# Altium PCB AVault.PcbDoc (part 2 of 2)
Units mm, origin at the board's own origin, x right, y up, seen from the top; angles counter-clockwise.
Board outline 85.78 x 73.28 mm, 2 copper layers (Top Layer, Bottom Layer); 122 components, 80 nets, 439 pads, 261 vias.
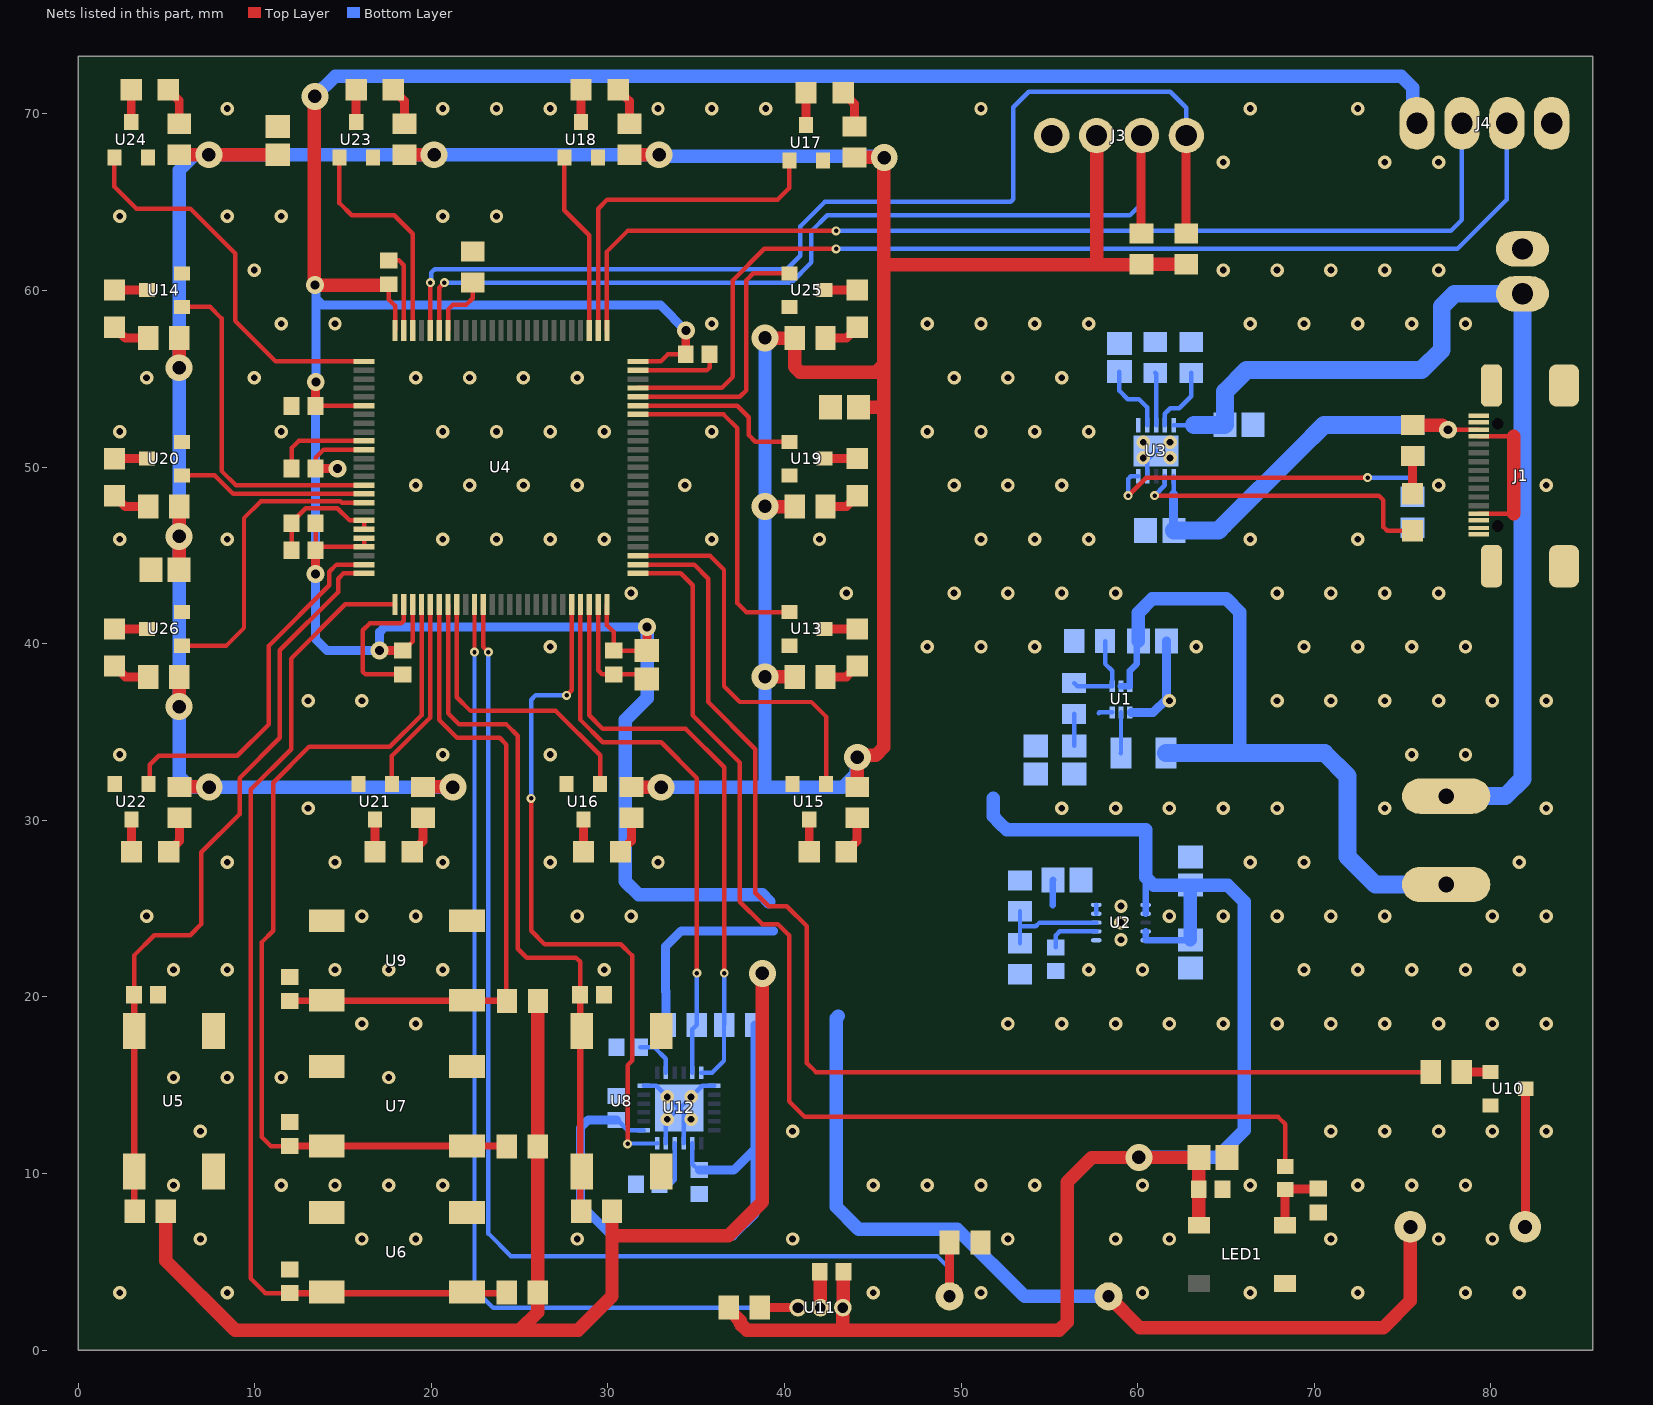
[diagram p2: the nets of this part, all layers, seen from the top]

## Via types
v1: diameter 0.762, hole 0.381, Top Layer to Bottom Layer, tented both sides, 222 vias
v2: diameter 1.524, hole 0.762, Top Layer to Bottom Layer, tented both sides, 17 vias
v3: diameter 0.508, hole 0.254, Top Layer to Bottom Layer, tented both sides, 14 vias
v4: diameter 1.016, hole 0.508, Top Layer to Bottom Layer, tented both sides, 8 vias

## Nets (pads, with @x,y where several pads share a name; then routed paths per layer and width w, separated by ;. In a path a pad name is that pad's centre, name@x,y a point inside that pad or via, vN(x,y) a via of type N, cw(c..) or ccw(c..) an arc to the next point about the centre after c; other vN are vias at no path point)
+3V3: B1.1 C6.2 C11.2 C12.2 C13.2 C14.2 C15.2 C16.2 C17.2 C18.2 C19.2 C29.2 C31.2 J4.1 R4.2 R10.2 R11.2 R12.2 R13.2 R16.2 R20.2 R21.2 R22.1 U2.9 U2.10 U4.6 U4.11 U4.21 U4.22 U4.28 U4.50 U4.75 U4.100 U12.8 U12.13 | length 374.8
  Top Layer w0.254: C12.2@13.448,46.824 C11.2@13.448,45.3 13.633,45.485 U4.22@16.2,45.485 U4.21@16.2,45.985 ; C13.2@13.448,49.919 13.462,49.933 13.462,50.546 13.901,50.985 U4.11@16.2,50.985 ; C19.2@13.448,53.464 13.469,53.485 U4.6@16.2,53.485 ; C17.2@17.599,60.359 17.599,59.49 17.949,59.14 U4.100@17.949,57.734 ; C14.2@18.377,39.61 18.427,39.61 18.949,40.133 U4.28@18.949,42.235 ; U4.50@29.95,42.235 29.95,41.049 30.325,40.674 C15.2@30.325,39.61 30.327,39.608 C18.2@32.204,39.608 ; U4.75@31.699,55.985 32.998,55.985 33.401,56.388 34.408,56.388 C16.2@34.411,56.385
  Top Layer w0.508: v4@13.448,43.968 C11.2@13.448,45.3 ; C19.2@13.448,53.464 v4@13.448,54.796 ; C13.2@13.457,49.911 13.461,49.915 14.684,49.915 v4(14.689,49.911) ; v4@17.095,39.61 C14.2@18.427,39.61 ; C18.2@32.204,39.608 v4@32.204,40.941 ; C16.2@34.411,56.385 v4@34.411,57.717
  Top Layer w0.762: R10.2@4.963,7.865 4.963,5.07 8.89,1.143 25.019,1.143 ; v2@13.38,70.959 13.38,60.359 v4(13.413,60.325) ; v4@13.432,60.307 C17.2@17.548,60.307 ; R16.2@26.045,19.78 26.035,19.77 26.035,2.159 25.019,1.143 ; R13.2@30.236,7.865 30.236,6.477 ; v2(38.754,21.336) 38.754,8.401 36.83,6.477 30.236,6.477 ; R22.1@58.348,3.048 60.126,1.27 73.914,1.27 75.438,2.794 B1.1@75.438,6.985 ; 25.019,1.143 28.321,1.143 30.236,3.058 30.236,6.477
  Bottom Layer w0.254: C29.2@30.53,13.041 31.105,12.466 U12.13@32.045,12.466 ; U12.8@34.786,11.725 34.786,10.543 35.129,10.2 C31.2@35.179,10.2 ; U2.9@57.651,24.714 U2.10@57.651,25.214
  Bottom Layer w0.381: 55.19,25.197 55.19,26.614 C6.2@55.203,26.627
  Bottom Layer w0.508: v4(13.413,60.325) 13.462,60.276 13.462,59.563 ; v4@13.435,54.783 13.435,49.911 ; v4(13.462,54.81) 13.462,59.563 ; v4(14.689,49.911) 13.435,49.911 ; C29.2@30.48,13.041 28.894,13.041 28.448,12.595 28.448,8.255 30.226,6.477 37.084,6.477 38.34,7.733 38.34,11.416 ; v4(32.218,40.954) 17.379,40.954 17.082,40.657 v4(17.082,39.624) 14.097,39.624 13.435,40.286 v4(13.435,43.954) 13.435,49.911 ; R20.2@33.288,18.415 33.281,18.422 33.281,20.313 33.274,20.32 33.274,22.86 34.163,23.749 39.37,23.749 ; v4(34.424,57.731) 32.973,59.182 13.843,59.182 13.462,59.563 ; C31.2@35.179,10.2 37.124,10.2 38.34,11.416 ; R21.2@38.34,18.415 38.34,11.416
  Bottom Layer w0.762: v2(13.413,70.993) 14.556,72.136 74.93,72.136 75.582,71.484 75.582,69.706 J4.1@75.819,69.469 ; v4(32.218,40.954) 32.218,36.917 30.988,35.687 30.988,26.543 31.75,25.781 38.735,25.781 39.116,25.4 ; 43.053,18.923 42.926,18.796 42.926,8.128 44.196,6.858 49.784,6.858 53.594,3.048 R22.1@58.348,3.048
+5V: C2.2 C3.2 C4.2 C5.2 C25.2 C26.2 C28.2 C33.2 C34.2 C35.2 J3.2 LED1.1 R1.1 R14.2 R15.2 R19.2 R24.2 R25.2 R26.2 R27.2 R28.2 R29.2 R30.2 R31.2 R32.2 R33.2 R34.2 R35.2 R36.2 R37.2 U1.6 U2.1 U2.2 U2.4 U2.5 U11.1 | length 317.4
  Top Layer w0.762: C34.2@5.724,44.196 v2(5.724,46.081) ; v2@5.733,36.449 R34.2@5.733,38.122 ; v2@5.733,46.09 R30.2@5.733,47.762 ; v2@5.733,55.635 R24.2@5.733,57.307 ; R32.2@5.733,67.697 v2@7.405,67.697 ; R36.2@5.75,31.895 v2@7.422,31.895 ; v2(7.414,67.688) C33.2@11.303,67.688 ; R33.2@18.478,67.697 v2@20.15,67.697 ; R37.2@19.54,31.895 v2@21.212,31.895 ; R26.2@31.222,67.697 v2@32.895,67.697 ; R28.2@31.33,31.895 31.339,31.886 33.011,31.886 v2(33.02,31.877) ; R19.2@36.844,2.413 36.844,2.313 R19.2@37.038,2.119 ; R19.2@37.039,2.119 37.486,1.673 37.486,1.517 37.86,1.143 43.307,1.143 ; v2@38.906,38.122 R25.2@40.578,38.122 ; v2@38.906,47.768 R31.2@40.578,47.768 ; v2@38.906,57.307 R35.2@40.578,57.307 40.578,55.67 40.875,55.372 45.18,55.372 45.627,55.818 ; C28.2@43.347,4.445 43.327,4.425 43.327,2.433 U11.1@43.307,2.413 43.307,1.143 ; R27.2@43.967,67.534 v2@45.64,67.534 ; R29.2@44.12,31.895 v2@44.12,33.567 ; v2(44.129,33.576) 44.247,33.695 45.18,33.695 45.627,34.141 45.627,53.086 45.627,55.818 ; C35.2@44.204,53.386 45.627,53.386 ; v2(45.649,67.525) 45.627,67.504 45.627,61.468 ; J3.2@57.673,68.772 57.673,61.468 ; R15.2@60.213,61.468 57.673,61.468 ; R15.2@60.213,61.482 R14.2@62.753,61.482 ; LED1.1@63.477,7.079 63.469,7.088 63.469,10.904 C26.2@63.46,10.913 57.395,10.913 56.007,9.525 56.007,1.589 55.561,1.143 43.307,1.143 ; 45.627,55.818 45.627,61.468 ; 45.627,61.468 57.673,61.468
  Bottom Layer w0.254: C3.2@56.402,34.223 R1.1@56.402,36.028 ; 57.785,36.068 57.829,36.112 U1.6@58.555,36.112
  Bottom Layer w0.381: U2.4@60.451,23.714 U2.5@60.451,23.214 62.966,23.214 C5.2@62.988,23.236 ; U2.2@60.451,24.714 U2.1@60.451,25.214 60.451,26.78 60.452,26.781
  Bottom Layer w0.762: v2(21.221,31.886) v2(7.431,31.886) 6.341,31.886 5.724,32.503 v2(5.724,36.44) v2(5.724,46.081) v2(5.724,55.626) 5.724,66.811 6.601,67.688 v2(7.414,67.688) v2(20.159,67.688) v2@32.624,67.688 ; v2(32.904,67.688) 32.985,67.607 45.567,67.607 v2(45.649,67.525) ; v2(33.02,31.877) 38.862,31.877 ; v2(38.897,57.316) v2(38.897,47.777) v2(38.897,38.131) 38.897,31.912 38.862,31.877 ; v2(44.129,33.576) 44.069,33.516 44.069,32.639 43.307,31.877 38.862,31.877 ; 51.816,31.242 51.816,30.226 52.197,29.845 52.578,29.464 60.452,29.464 60.452,26.781 60.898,26.335 C4.2@62.988,26.335 ; v2(60.071,10.922) 64.516,10.922 66.04,12.446 66.04,25.4 65.105,26.335 C4.2@62.988,26.335 ; C5.2@62.988,23.236 C4.2@62.988,26.335
GND: C1.1 C2.1 C3.1 C4.1 C5.1 C6.1 C7.1 C8.1 C9.2 C10.1 C11.1 C12.1 C13.1 C14.1 C15.1 C16.1 C17.1 C18.1 C19.1 C20.1 C21.1 C22.1 C23.1 C24.1 C25.1 C26.1 C27.1 C28.1 C29.1 C30.1 C31.1 C32.1 C33.1 C34.1 C35.1 J1.A1 J1.A12 J1.B1 J1.B12 J1.S_1 J1.S_2 J1.S_3 J1.S_4 J2.2 J3.1 J4.4 LED1.3 R2.1 R5.1 R6.1 R7.1 R9.1 R23.1 R38.1 U1.4 U2.6 U2.11 U3.4 U3.6 U3.11 U4.10 U4.19 U4.20 U4.27 U4.49 U4.74 U4.99 U5.3 U5.4 U6.3 U6.4 U7.3 U7.4 U8.3 U8.4 U9.3 U9.4 U10.2 U11.2 U12.1 U12.9 U12.11 U12.18 U12.25 U13.2 U14.2 U15.2 U16.2 U17.2 U18.2 U19.2 U20.2 U21.2 U22.2 U23.2 U24.2 U25.2 U26.2 | length 55.2
  Top Layer w0.254: C11.1@12.099,45.3 12.099,46.874 12.896,47.672 14.685,47.672 15.372,46.985 U4.19@16.2,46.985 U4.20@16.2,46.484 ; C13.1@12.099,49.919 12.099,51.088 12.495,51.484 U4.10@16.2,51.484 ; C17.1@17.599,61.708 18.175,61.708 18.45,61.433 U4.99@18.45,57.734 ; C14.1@18.377,38.261 16.278,38.261 16.129,38.409 16.129,40.767 16.51,41.148 18.301,41.148 18.45,41.297 U4.27@18.45,42.235 ; U4.49@29.449,42.235 29.449,38.496 29.684,38.261 C15.1@30.325,38.261 31.952,38.261 C18.1@32.204,38.008 ; U4.74@31.699,55.484 35.612,55.484 35.76,55.633 C16.1@35.76,56.385
  Top Layer w0.762: C28.1@41.997,4.445 42.017,4.425 42.017,2.433 U11.2@42.037,2.413
  Bottom Layer w0.254: U12.18@32.045,14.966 32.735,14.966 33.985,13.716 U12.25@34.036,13.716 ; U12.11@33.286,11.725 33.286,12.966 U12.25@34.036,13.716 ; U12.25@34.087,13.716 35.337,14.966 U12.1@36.027,14.966 ; U12.9@34.286,11.725 34.286,13.466 U12.25@34.036,13.716 ; U3.4@60.54,49.479 60.54,50.427 U3.11@61.04,50.927
  Bottom Layer w0.508: U1.4@59.659,36.112 60.877,36.112 61.633,36.868 C1.1@61.633,40.154
  other v1: 2.359,3.248 8.455,3.248 45.031,3.248 51.127,3.248 60.271,3.248 66.367,3.248 72.463,3.248 78.559,3.248 81.607,3.248 6.931,6.296 16.075,6.296 19.123,6.296 28.267,6.296 40.459,6.296 52.651,6.296 58.747,6.296 61.795,6.296 70.939,6.296 77.035,6.296 80.083,6.296 5.407,9.344 11.503,9.344 14.551,9.344 17.599,9.344 20.647,9.344 45.031,9.344 48.079,9.344 51.127,9.344 54.175,9.344 60.271,9.344 66.367,9.344 72.463,9.344 75.511,9.344 78.559,9.344 6.931,12.392 40.459,12.392 70.939,12.392 73.987,12.392 77.035,12.392 80.083,12.392 83.131,12.392 33.36,13.081 34.712,13.081 33.36,14.341 34.712,14.341 5.407,15.44 8.455,15.44 11.503,15.44 17.599,15.44 16.075,18.488 19.123,18.488 52.651,18.488 55.699,18.488 58.747,18.488 61.795,18.488 64.843,18.488 67.891,18.488 70.939,18.488 73.987,18.488 77.035,18.488 80.083,18.488 83.131,18.488 5.407,21.536 8.455,21.536 14.551,21.536 17.599,21.536 20.647,21.536 29.791,21.536 57.223,21.536 60.271,21.536 69.415,21.536 72.463,21.536 75.511,21.536 78.559,21.536 81.607,21.536 59.055,23.241 59.051,24.216 3.883,24.584 16.075,24.584 19.123,24.584 28.267,24.584 31.315,24.584 61.795,24.584 64.843,24.584 67.891,24.584 70.939,24.584 73.987,24.584 80.083,24.584 83.131,24.584 59.055,25.146 8.455,27.632 14.551,27.632 20.647,27.632 26.743,27.632 32.839,27.632 66.367,27.632 69.415,27.632 81.607,27.632 13.027,30.68 55.699,30.68 58.747,30.68 61.795,30.68 64.843,30.68 67.891,30.68 73.987,30.68 83.131,30.68 2.359,33.728 20.647,33.728 26.743,33.728 75.511,33.728 78.559,33.728 13.027,36.776 16.075,36.776 61.795,36.776 67.891,36.776 70.939,36.776 73.987,36.776 77.035,36.776 80.083,36.776 83.131,36.776 26.743,39.824 48.079,39.824 51.127,39.824 54.175,39.824 63.319,39.824 69.415,39.824 72.463,39.824 75.511,39.824 78.559,39.824 31.315,42.872 43.507,42.872 49.603,42.872 52.651,42.872 55.699,42.872 58.747,42.872 67.891,42.872 70.939,42.872 73.987,42.872 77.035,42.872 2.359,45.92 8.455,45.92 20.647,45.92 23.695,45.92 26.743,45.92 29.791,45.92 35.887,45.92 41.983,45.92 51.127,45.92 54.175,45.92 57.223,45.92 66.367,45.92 72.463,45.92 19.123,48.968 22.171,48.968 25.219,48.968 28.267,48.968 34.363,48.968 49.603,48.968 52.651,48.968 55.699,48.968 77.035,48.968 83.131,48.968 60.307,50.52 61.831,50.52 60.307,51.409 61.831,51.409 2.359,52.016 11.503,52.016 20.647,52.016 23.695,52.016 26.743,52.016 29.791,52.016 35.887,52.016 48.079,52.016 51.127,52.016 54.175,52.016 57.223,52.016 3.883,55.064 9.979,55.064 19.123,55.064 22.171,55.064 25.219,55.064 28.267,55.064 49.603,55.064 52.651,55.064 55.699,55.064 11.503,58.112 14.551,58.112 35.887,58.112 48.079,58.112 51.127,58.112 54.175,58.112 57.223,58.112 66.367,58.112 69.415,58.112 72.463,58.112 75.511,58.112 78.559,58.112 9.979,61.16 64.843,61.16 67.891,61.16 70.939,61.16 73.987,61.16 77.035,61.16 2.359,64.208 8.455,64.208 11.503,64.208 20.647,64.208 23.695,64.208 64.843,67.256 73.987,67.256 77.035,67.256 8.455,70.304 20.647,70.304 23.695,70.304 26.743,70.304 32.839,70.304 35.887,70.304 38.935,70.304 51.127,70.304 66.367,70.304 72.463,70.304
NetB1_2: B1.2 U10.3 | length 7.8
  Top Layer w0.508: B1.2@81.938,6.985 81.955,7.002 81.955,14.788 U10.3@81.973,14.805
NetC7_2: C7.2 U2.7 | length 3.1
  Bottom Layer w0.254: C7.2@55.368,22.811 55.372,22.815 55.372,23.495 55.591,23.714 U2.7@57.651,23.714
NetC10_2: C10.2 U3.7 | length 4.1
  Bottom Layer w0.254: C10.2@58.966,55.407 58.966,54.318 59.436,53.848 60.071,53.848 60.54,53.379 U3.7@60.54,52.375
NetC20_2: C20.2 R10.1 U4.25 U5.1 U5.2 | length 43.4
  Top Layer w0.254: C20.2@3.181,20.134 3.175,20.14 3.175,22.352 4.318,23.495 6.35,23.495 6.985,24.13 6.985,28.194 9.144,30.353 9.144,32.385 11.43,34.671 11.43,39.624 14.732,42.926 14.732,43.688 15.028,43.984 U4.25@16.2,43.984
  Top Layer w0.381: C20.2@3.181,20.134 3.181,7.897 R10.1@3.213,7.865
NetC21_2: C21.2 R11.1 U4.26 U6.1 U6.2 | length 58.1
  Top Layer w0.254: C21.2@11.989,3.23 10.613,3.23 9.779,4.064 9.779,31.75 12.065,34.036 12.065,39.165 15.135,42.235 U4.26@17.949,42.235
  Top Layer w0.381: C21.2@11.989,3.23 14.083,3.23 22.033,3.23 24.232,3.23 R11.1@24.272,3.27
NetC22_2: C22.2 R12.1 U4.29 U7.1 U7.2 | length 50.7
  Top Layer w0.254: C22.2@11.989,11.561 10.918,11.561 10.414,12.065 10.414,23.114 11.049,23.749 11.049,32.131 13.081,34.163 17.653,34.163 19.449,35.959 U4.29@19.449,42.235
  Top Layer w0.381: C22.2@11.989,11.561 U7.2@14.083,11.561 U7.1@22.033,11.561 24.236,11.561 R12.1@24.272,11.525
NetC23_2: C23.2 R13.1 U4.32 U8.1 U8.2 | length 40.7
  Top Layer w0.254: U4.32@20.95,42.235 20.95,36.073 21.59,35.433 24.257,35.433 24.892,34.798 24.892,22.733 25.4,22.225 28.194,22.225 28.432,21.987 C23.2@28.432,20.134
  Top Layer w0.381: C23.2@28.432,20.134 28.432,18.08 28.432,10.13 28.432,7.919 R13.1@28.486,7.865
NetC24_2: C24.2 R16.1 U4.31 U9.1 U9.2 | length 37.8
  Top Layer w0.254: U4.31@20.449,42.235 20.449,35.685 21.463,34.671 23.876,34.671 24.257,34.29 24.257,19.818 R16.1@24.295,19.78
  Top Layer w0.381: C24.2@11.989,19.78 R16.1@24.295,19.78
NetC27_2: C27.2 LED1.4 R18.2 | length 3.9
  Top Layer w0.508: LED1.4@68.349,7.079 R18.2@68.349,9.112 68.369,9.132 70.211,9.132 C27.2@70.231,9.152
NetC30_2: C30.2 U12.20 | length 2.5
  Bottom Layer w0.254: C30.2@31.83,17.145 32.639,17.145 33.286,16.498 U12.20@33.286,15.707
NetC32_2: C32.2 U12.10 | length 3
  Bottom Layer w0.254: C32.2@32.933,9.398 33.528,9.398 33.786,9.656 U12.10@33.786,11.725
NetD1_1: D1.1 R3.1 | length 2.1
  Top Layer w0.508: D1.1@75.565,48.494 75.571,48.5 75.571,50.627 R3.1@75.577,50.633
NetD1_2: D1.2 U3.2 | length 17.7
  Top Layer w0.254: v3(60.96,48.387) 73.66,48.387 73.914,48.133 73.914,46.609 74.129,46.394 D1.2@75.565,46.394
  Bottom Layer w0.254: v3(60.96,48.387) 61.54,48.967 U3.2@61.54,49.479
NetD2_1: D2.1 R24.1 | length 2.2
  Top Layer w0.508: D2.1@2.064,57.924 2.681,57.307 R24.1@3.983,57.307
NetD2_2: D2.2 U14.3 | length 1.8
  Top Layer w0.508: D2.2@2.064,60.024 U14.3@3.896,60.024
NetD3_1: D3.1 R25.1 | length 2
  Top Layer w0.508: R25.1@42.328,38.122 43.503,38.122 D3.1@44.12,38.739
NetD3_2: D3.2 U13.3 | length 1.8
  Top Layer w0.508: U13.3@42.275,40.839 D3.2@44.12,40.839
NetD4_1: D4.1 R26.1 | length 2.2
  Top Layer w0.508: D4.1@30.588,71.366 31.222,70.732 R26.1@31.222,69.447
NetD4_2: D4.2 U18.3 | length 1.8
  Top Layer w0.508: U18.3@28.488,69.534 D4.2@28.488,71.366
NetD5_1: D5.1 R27.1 | length 2.2
  Top Layer w0.508: D5.1@43.325,71.203 43.967,70.561 R27.1@43.967,69.284
NetD5_2: D5.2 U17.3 | length 1.8
  Top Layer w0.508: U17.3@41.225,69.372 D5.2@41.225,71.203
NetD6_1: D6.1 R28.1 | length 2.2
  Top Layer w0.508: D6.1@30.713,28.226 31.33,28.843 R28.1@31.33,30.145
NetD6_2: D6.2 U16.3 | length 1.8
  Top Layer w0.508: D6.2@28.613,28.226 U16.3@28.613,30.058
NetD7_1: D7.1 R29.1 | length 2.2
  Top Layer w0.508: D7.1@43.503,28.226 44.12,28.843 R29.1@44.12,30.145
NetD7_2: D7.2 U15.3 | length 1.8
  Top Layer w0.508: D7.2@41.403,28.226 U15.3@41.403,30.058
NetD8_1: D8.1 R30.1 | length 2.2
  Top Layer w0.508: D8.1@2.064,48.379 2.681,47.762 R30.1@3.983,47.762
NetD8_2: D8.2 U20.3 | length 1.8
  Top Layer w0.508: D8.2@2.064,50.479 U20.3@3.896,50.479
NetD9_1: D9.1 R31.1 | length 2
  Top Layer w0.508: R31.1@42.328,47.768 43.503,47.768 D9.1@44.12,48.385
NetD9_2: D9.2 U19.3 | length 1.8
  Top Layer w0.508: U19.3@42.275,50.485 D9.2@44.12,50.485
NetD10_1: D10.1 R32.1 | length 2.2
  Top Layer w0.508: D10.1@5.114,71.366 5.733,70.747 R32.1@5.733,69.447
NetD10_2: D10.2 U24.3 | length 1.8
  Top Layer w0.508: U24.3@3.014,69.534 D10.2@3.014,71.366
NetD11_1: D11.1 R33.1 | length 2.2
  Top Layer w0.508: D11.1@17.851,71.366 18.478,70.739 R33.1@18.478,69.447
NetD11_2: D11.2 U23.3 | length 1.8
  Top Layer w0.508: U23.3@15.751,69.534 D11.2@15.751,71.366
NetD12_1: D12.1 R36.1 | length 2.2
  Top Layer w0.508: D12.1@5.133,28.226 5.75,28.843 R36.1@5.75,30.145
NetD12_2: D12.2 U22.3 | length 1.8
  Top Layer w0.508: D12.2@3.033,28.226 U22.3@3.033,30.058
NetD13_1: D13.1 R37.1 | length 2.2
  Top Layer w0.508: D13.1@18.923,28.226 19.54,28.843 R37.1@19.54,30.145
NetD13_2: D13.2 U21.3 | length 1.8
  Top Layer w0.508: D13.2@16.823,28.226 U21.3@16.823,30.058
NetD14_1: D14.1 R34.1 | length 2.2
  Top Layer w0.508: D14.1@2.064,38.739 2.681,38.122 R34.1@3.983,38.122
NetD14_2: D14.2 U26.3 | length 1.8
  Top Layer w0.508: D14.2@2.064,40.839 U26.3@3.896,40.839
NetD15_1: D15.1 R35.1 | length 2
  Top Layer w0.508: R35.1@42.328,57.307 43.503,57.307 D15.1@44.12,57.924
NetD15_2: D15.2 U25.3 | length 1.8
  Top Layer w0.508: U25.3@42.275,60.024 D15.2@44.12,60.024
NetJ3_3: J3.3 R15.1 U4.95 | length 54.6
  Top Layer w0.254: U4.95@20.449,57.734 20.449,60.151 v3(20.741,60.443)
  Top Layer w0.508: R15.1@60.198,63.232 J3.3@60.198,68.772
  Bottom Layer w0.254: v3(20.741,60.443) 40.377,60.443 41.529,61.595 41.529,63.373 42.418,64.262 59.563,64.262 60.213,64.912 J3.3@60.213,68.772
NetJ3_4: J3.4 R14.1 U4.96 | length 61.8
  Top Layer w0.254: U4.96@19.95,57.734 v3(19.95,60.443)
  Top Layer w0.508: R14.1@62.738,63.232 J3.4@62.738,68.772
  Bottom Layer w0.254: v3(19.95,60.443) 19.998,60.491 19.998,61.019 20.193,61.214 40.132,61.214 40.894,61.976 40.894,63.627 42.291,65.024 52.81,65.024 52.959,65.173 52.959,70.38 53.826,71.247 61.849,71.247 62.753,70.343 J3.4@62.753,68.772
NetL1_2: L1.2 U1.5 | length 2.3
  Bottom Layer w0.254: L1.2@59.05,33.804 59.055,33.809 U1.5@59.055,36.112
NetR1_2: R1.2 R2.2 U1.1 | length 5
  Bottom Layer w0.254: R1.2@56.402,37.778 56.588,37.592 U1.1@58.555,37.592 58.555,38.473 58.152,38.876 R2.2@58.152,40.154
NetR4_1: R4.1 R5.2 U2.8 | length 6.2
  Bottom Layer w0.254: R5.2@53.336,23.043 53.336,24.003 ; R4.1@53.336,24.849 53.336,24.003 ; U2.8@57.651,24.214 54.44,24.214 54.229,24.003 53.336,24.003
NetR6_2: R6.2 U3.8 | length 3
  Bottom Layer w0.254: R6.2@60.998,55.332 61.04,55.29 U3.8@61.04,52.375
NetR7_2: R7.2 U3.9 | length 3.9
  Bottom Layer w0.254: U3.9@61.54,52.375 61.54,53.031 61.849,53.34 62.357,53.34 63.03,54.013 R7.2@63.03,55.332
NetR8_1: R8.1 R9.2 U3.5 | length 21.2
  Top Layer w0.254: v3(59.46,48.387) 60.476,49.403 v3(73.025,49.403)
  Bottom Layer w0.254: v3(59.46,48.387) 59.46,49.33 59.609,49.479 U3.5@60.04,49.479 ; v3(73.025,49.403) 75.571,49.403 ; 75.465,49.022 75.465,48.419 R9.2@75.565,48.319
  Bottom Layer w0.508: R9.2@75.565,48.319 75.571,48.325 75.571,49.403 R8.1@75.571,50.627
NetR17_1: R17.1 U10.1 | length 1.6
  Top Layer w0.508: R17.1@78.345,15.748 78.349,15.752 79.969,15.752 U10.1@79.972,15.756
NetR17_2: R17.2 U4.52 | length 70.2
  Top Layer w0.254: U4.52@31.699,44.485 34.89,44.485 35.687,43.688 35.687,36.703 38.354,34.036 38.354,25.908 39.116,25.146 40.132,25.146 41.275,24.003 41.275,16.256 41.783,15.748 R17.2@76.595,15.748
NetR18_1: R18.1 U4.51 | length 66.4
  Top Layer w0.254: U4.51@31.699,43.984 34.121,43.984 34.798,43.307 34.798,35.941 37.465,33.274 37.465,25.4 38.735,24.13 39.624,24.13 40.259,23.495 40.259,14.097 41.148,13.208 67.945,13.208 68.349,12.804 R18.1@68.349,10.412
NetR19_1: R19.1 U4.35 U11.3 | length 59.7
  Top Layer w0.254: v3(22.45,39.526) U4.35@22.45,42.235
  Top Layer w0.508: R19.1@38.594,2.413 U11.3@40.767,2.413
  Bottom Layer w0.254: v3(22.45,39.526) 22.45,3.458 23.517,2.391 31.959,2.391 31.98,2.413 U11.3@40.767,2.413
NetR20_1: R20.1 U4.47 U12.23 | length 31.3
  Top Layer w0.254: U4.47@28.45,42.235 28.448,42.233 28.448,35.687 29.718,34.417 33.02,34.417 35.038,32.399 v3(35.038,21.355)
  Bottom Layer w0.254: U12.23@34.786,15.707 34.786,18.163 R20.1@35.038,18.415 v3@35.038,21.335
NetR21_1: R21.1 U4.48 U12.24 | length 33.3
  Top Layer w0.254: U4.48@28.95,42.235 28.95,35.947 29.718,35.179 34.417,35.179 36.59,33.006 v3(36.59,21.355)
  Bottom Layer w0.254: U12.24@35.286,15.707 35.9,15.707 36.576,16.383 36.576,18.401 R21.1@36.59,18.415 v3@36.59,21.335
NetR22_2: R22.2 R23.2 U4.36 | length 67.3
  Top Layer w0.254: U4.36@22.949,42.235 22.949,39.818 v3(23.241,39.526)
  Top Layer w0.508: R22.2@49.348,3.048 R23.2@49.348,6.096
  Bottom Layer w0.254: v3(23.241,39.526) 23.241,6.604 24.511,5.334 48.641,5.334 49.403,4.572 49.403,3.103 R22.2@49.348,3.048
NetR38_2: R38.2 U4.94 | length 3.8
  Top Layer w0.254: U4.94@20.95,57.734 20.95,58.923 21.209,59.182 21.971,59.182 22.352,59.563 R38.2@22.352,60.458
NetU4_1: U4.1 U24.1 | length 22.1
  Top Layer w0.254: U24.1@2.064,67.534 2.064,65.881 3.302,64.643 6.35,64.643 8.89,62.103 8.89,58.293 11.198,55.985 U4.1@16.2,55.985
NetU4_15: U4.15 U14.1 | length 19.5
  Top Layer w0.254: U14.1@5.896,59.074 7.474,59.074 8.128,58.42 8.128,49.784 8.928,48.984 U4.15@16.2,48.984
NetU4_16: U4.16 U20.1 | length 10.7
  Top Layer w0.254: U20.1@5.896,49.529 7.747,49.53 8.792,48.485 U4.16@16.2,48.485
NetU4_17: U4.17 U26.1 | length 17.4
  Top Layer w0.254: U26.1@5.896,39.889 5.906,39.878 8.382,39.878 9.398,40.894 9.398,47.117 10.359,48.078 14.854,48.078 14.947,47.985 U4.17@16.2,47.985
NetU4_24: U4.24 U22.1 | length 21
  Top Layer w0.254: U22.1@3.983,32.058 4.064,32.139 4.064,33.147 4.572,33.655 9.017,33.655 10.795,35.433 10.795,39.878 14.224,43.307 14.224,44.069 14.64,44.485 U4.24@16.2,44.485
NetU4_30: U4.30 U21.1 | length 11.1
  Top Layer w0.254: U21.1@17.773,32.058 17.773,33.648 19.95,35.825 U4.30@19.95,42.235
NetU4_33: U4.33 U16.1 | length 16.4
  Top Layer w0.254: U4.33@21.449,42.235 21.449,36.971 22.225,36.195 27.051,36.195 29.563,33.683 U16.1@29.563,32.058
NetU4_46: U4.46 U12.12 | length 39.2
  Top Layer w0.254: v3(25.654,31.242) 25.654,23.749 26.416,22.987 30.734,22.987 31.369,22.352 31.369,16.383 31.115,16.129 v3(31.115,11.684) ; v3(27.66,37.08) 27.949,37.369 U4.46@27.949,42.235
  Bottom Layer w0.254: v3(25.654,31.242) 25.654,36.83 25.904,37.08 v3(27.66,37.08) ; v3(31.115,11.684) 31.135,11.704 U12.12@32.785,11.704 ; U12.12@32.786,11.705 U12.12@32.786,11.725
NetU4_53: U4.53 U15.1 | length 22.1
  Top Layer w0.254: U4.53@31.699,44.984 35.788,44.984 36.576,44.196 36.576,37.592 37.465,36.703 41.529,36.703 42.353,35.879 U15.1@42.353,32.058
NetU4_69: U4.69 U13.1 | length 19
  Top Layer w0.254: U4.69@31.699,52.984 36.551,52.984 37.338,52.197 37.338,42.291 37.846,41.783 40.269,41.783 U13.1@40.275,41.789
NetU4_70: U4.70 U19.1 | length 10
  Top Layer w0.254: U4.70@31.699,53.485 37.32,53.485 37.973,52.832 37.973,51.816 38.354,51.435 U19.1@40.275,51.435
NetU4_71: U4.71 U25.1 | length 15.1
  Top Layer w0.254: U4.71@31.699,53.984 37.474,53.984 37.846,54.356 37.846,60.579 38.241,60.974 U25.1@40.275,60.974
NetU4_77: U4.77 U17.1 | length 19.8
  Top Layer w0.254: U4.77@29.449,57.734 29.449,64.628 29.972,65.151 39.624,65.151 40.259,65.786 40.259,67.356 U17.1@40.275,67.372
NetU4_78: U4.78 U18.1 | length 10.4
  Top Layer w0.254: U18.1@27.538,67.534 27.538,64.537 28.95,63.125 U4.78@28.95,57.734
NetU4_98: U4.98 U23.1 | length 12.9
  Top Layer w0.254: U23.1@14.801,67.534 14.801,64.955 15.494,64.262 17.907,64.262 18.949,63.22 U4.98@18.949,57.734
SWCLK: J4.2 U4.76 | length 59.1
  Top Layer w0.254: U4.76@29.95,57.734 29.95,62.208 31.115,63.373 v3(42.926,63.373)
  Bottom Layer w0.254: v3(42.926,63.373) 77.724,63.373 78.359,64.008 J4.2@78.359,69.469
SWDIO: J4.3 U4.72 | length 61.1
  Top Layer w0.254: U4.72@31.699,54.485 36.451,54.485 37.084,55.118 37.084,60.579 38.862,62.357 v3(42.926,62.357)
  Bottom Layer w0.254: v3(42.926,62.357) 78.105,62.357 80.899,65.151 J4.3@80.899,69.469
VBAT: C9.1 J2.1 SW1.1 U3.10 | length 57.6
  Bottom Layer w0.254: U3.10@62.04,52.375 63.195,52.375
  Bottom Layer w1.016: 63.195,52.375 64.913,52.375 C9.1@64.939,52.401 64.939,54.271 66.167,55.499 76.073,55.499 77.216,56.642 77.216,59.095 77.938,59.817 J2.1@81.788,59.817 81.788,32.346 80.811,31.369 SW1.1@77.47,31.369
VBQ: C1.2 L1.1 SW1.2 U1.2 U1.3 | length 40.7
  Bottom Layer w0.381: U1.2@59.055,37.592 U1.3@59.555,37.592 59.555,38.473 59.944,38.862 C1.2@59.944,40.065
  Bottom Layer w0.762: C1.2@60.033,40.154 60.033,41.745 60.833,42.545 65.024,42.545 65.786,41.783 65.786,33.804
  Bottom Layer w1.016: L1.1@61.6,33.804 65.786,33.804 70.59,33.804 71.882,32.512 71.882,27.94 73.453,26.369 SW1.2@77.47,26.369
VBUS: C8.2 J1.A4 J1.A9 J1.B4 J1.B9 R3.2 R8.2 U3.1 | length 33.4
  Top Layer w0.254: v4(77.578,52.117) J1.A9@79.313,52.117 ; J1.B9@79.313,47.36 81.284,47.36 ; J1.B4@79.313,51.762 81.284,51.762
  Top Layer w0.762: R3.2@75.577,52.383 77.243,52.383 77.509,52.117 v4(77.578,52.117) ; 81.284,47.36 81.284,51.762
  Bottom Layer w0.254: 62.04,48.45 U3.1@62.04,49.479
  Bottom Layer w0.508: 62.04,48.45 62.04,46.421 C8.2@62.044,46.417 ; R8.2@75.577,52.383 77.312,52.383 v4(77.578,52.117)
  Bottom Layer w1.016: C8.2@62.044,46.417 64.578,46.417 64.877,46.716 69.09,50.929 70.544,52.383 R8.2@75.577,52.383
pads on no net: J1.21 J1.22 J1.A5 J1.A6 J1.A7 J1.A8 J1.B5 J1.B6 J1.B7 J1.B8 LED1.2 U2.3 U3.3 U4.2 U4.3 U4.4 U4.5 U4.7 U4.8 U4.9 U4.12 U4.13 U4.14 U4.18 U4.23 U4.34 U4.37 U4.38 U4.39 U4.40 U4.41 U4.42 U4.43 U4.44 U4.45 U4.54 U4.55 U4.56 U4.57 U4.58 U4.59 U4.60 U4.61 U4.62 U4.63 U4.64 U4.65 U4.66 U4.67 U4.68 U4.73 U4.79 U4.80 U4.81 U4.82 U4.83 U4.84 U4.85 U4.86 U4.87 U4.88 U4.89 U4.90 U4.91 U4.92 U4.93 U4.97 U12.2 U12.3 U12.4 U12.5 U12.6 U12.7 U12.14 U12.15 U12.16 U12.17 U12.19 U12.21 U12.22

## Polygon pours and split planes (outlines as drawn)
GND on Bottom Layer "GND_L02_P007" (solid, pour order 7): 85.725,73.279 0,73.279 0,0 85.725,0
+3V3 on Bottom Layer "Bottom Layer-+3V3" (solid, pour order 4): 57.023,24.511 58.039,24.511 58.039,25.654 55.88,25.654 55.88,28.194 37.338,28.194 37.338,17.145 49.657,17.145 49.657,22.225 57.023,22.225
+5V on Bottom Layer "Bottom Layer-+5V" (solid, pour order 0): 41.529,30.226 53.086,30.226 53.086,33.528 58.801,33.528 58.801,36.703 41.529,36.703
GND on Top Layer "GND_L01_P001" (solid, pour order 1): 85.725,73.279 0,73.279 0,0 85.725,0

## Keep-outs
Keep-Out Layer:
  circle w0.1: c48.466,68.46 r1.6
  circle w0.1: c69.42,45.506 r1.6
  circle w0.1: c69.42,68.46 r1.6
  circle w0.1: c48.466,45.506 r1.6
  lines w0.025: 59.817,32.639 60.833,32.639 60.833,34.925 59.817,34.925 59.817,32.639
  lines w0.254: 0,0 85.776,0 85.776,73.279 0,73.279 0,0

## Silkscreen, mask and mechanical layers (free items; w line width, h text height)
Top Overlay:
  lines w0.254: 46.443,70.483 46.443,53.845 46.443,43.483 71.443,43.483 71.443,70.483 46.443,70.483